# Altium PCB MiniPC.PcbDoc (part 14 of 24)
Units mm, origin at the board's own origin, x right, y up, seen from the top; angles counter-clockwise.
Board outline 175 x 155 mm, 16 copper layers (1_Top, 2_int1_(gnd), 3_int2_(power), 4_int3_(gnd), 5_int4_(sign), 6_int5_(power), 7_int6_(sign), 8_int7_(power), 9_int8_(gnd), 10_int9_(sign), 11_int10_(gnd), 12_int11_(sign), 13_int12_(gnd), 14_int13_(power), 15_int14_(gnd), 16_Bottom), stack 2.008 mm thick; 1046 components, 837 nets, 6010 pads, 4009 vias.
Unrouted connection lines stored in the file: 564.
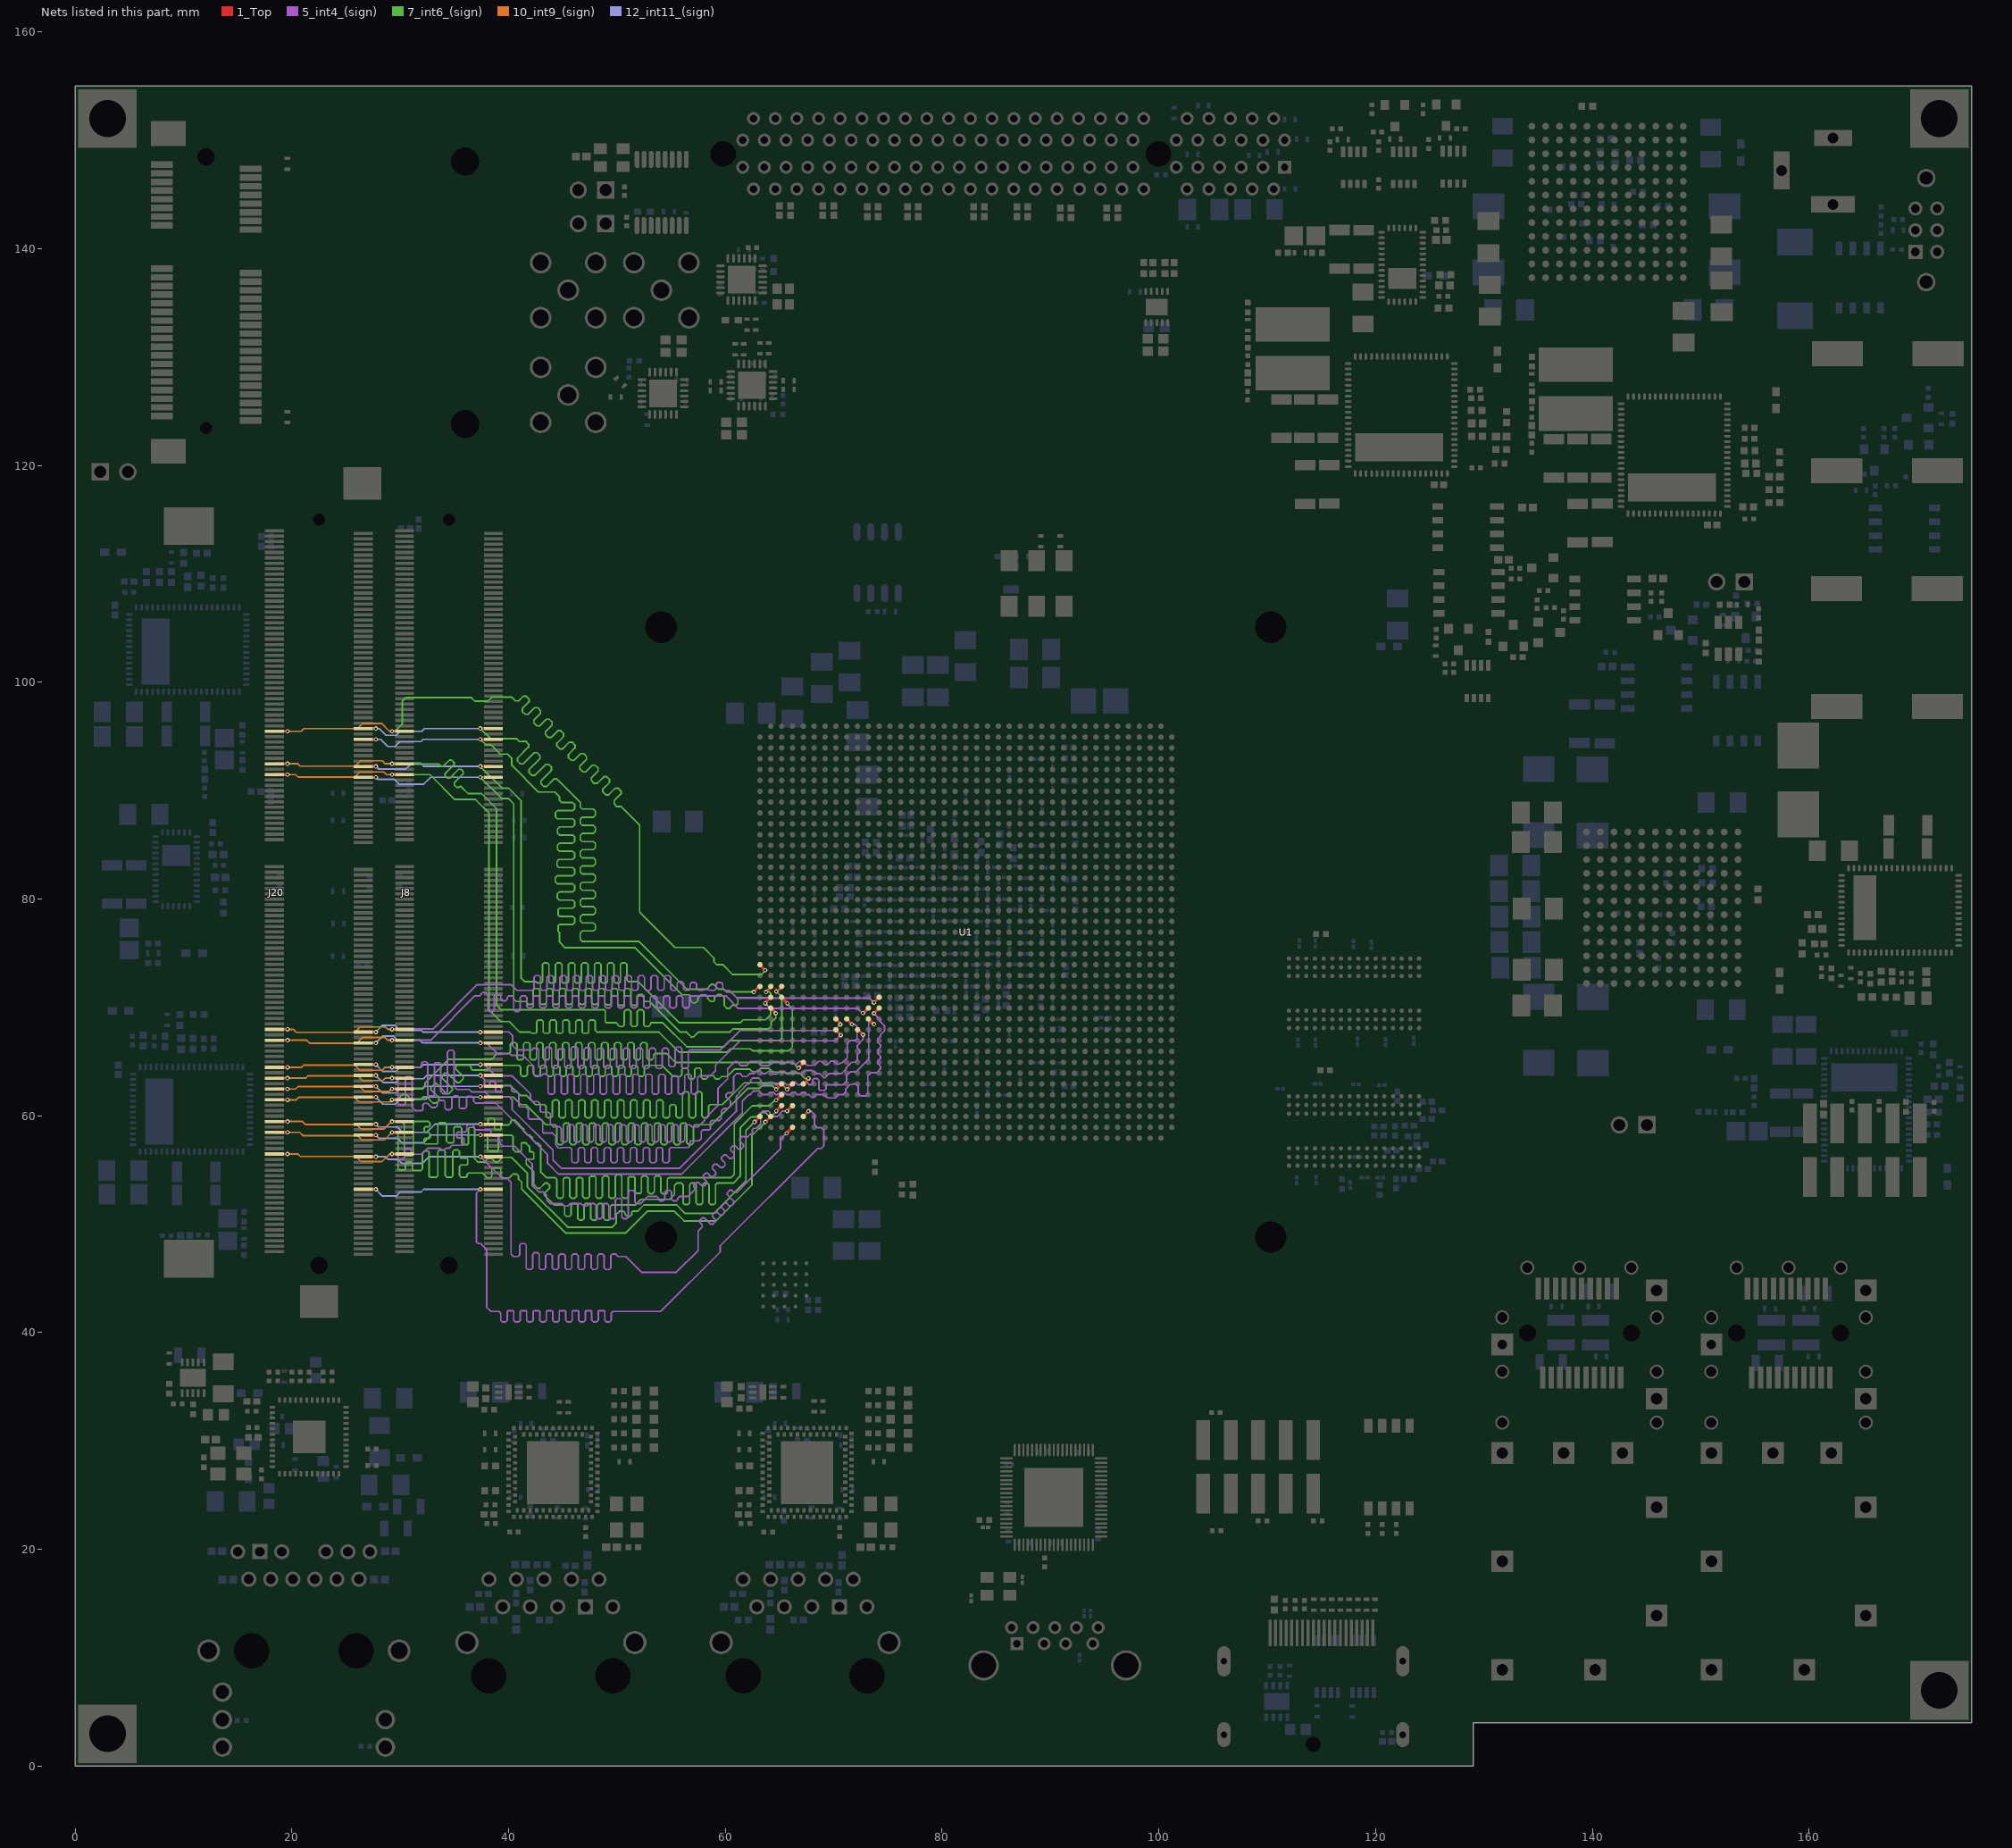
[diagram p26: the nets of this part, all layers, seen from the top]

## Via types
v1: diameter 0.4, hole 0.2, 1_Top to 16_Bottom, tented both sides, 1658 vias
v2: diameter 0.5, hole 0.2, 1_Top to 16_Bottom, tented both sides, 1014 vias
v3: diameter 0.7, hole 0.3, 1_Top to 16_Bottom, tented both sides, 915 vias
v4: diameter 0.6, hole 0.2, 1_Top to 16_Bottom, tented both sides, 278 vias
v5: diameter 0.4, hole 0.2, 1_Top to 16_Bottom, 93 vias
v6: diameter 0.4/0/0/0/0/0/0/0/0/0/0/0/0/0/0/0.4 (per signal layer), hole 0.2, 1_Top to 16_Bottom, tented both sides, 18 vias
v7: diameter 0.4/0/0/0/0/0/0/0/0/0/0/0.4/0.4/0.4/0.4/0.4 (per signal layer), hole 0.2, 1_Top to 16_Bottom, tented both sides, 16 vias
v8: diameter 0.5, hole 0.254, 1_Top to 16_Bottom, tented both sides, 15 vias
v9: diameter 0.5, hole 0.2, 1_Top to 16_Bottom, 2 vias

## Nets (pads, with @x,y where several pads share a name; then routed paths per layer and width w, separated by ;. In a path a pad name is that pad's centre, name@x,y a point inside that pad or via, vN(x,y) a via of type N, cw(c..) or ccw(c..) an arc to the next point about the centre after c; other vN are vias at no path point) (continued)
DDR4_SODIMM_DQ13: J8.25 J20.25 U1.AU5 | length 82.9
  1_Top w0.25: J20.25@26.6,53.225 v1(27.75,53.225) ; v1(37.398,53.225) J8.25@38.6,53.225 ; U1.AU5@67.194,59.939 67.194,59.944 v1(67.675,60.425)
  5_int4_(sign) w0.15: v1(37.398,53.225) 37.023,52.85 37.023,48.377 37.175,48.225 37.428,48.225 37.975,47.678 37.975,42.35 38.375,41.95 38.675,41.95 39.125,41.95 39.275,41.8 39.275,41.141 39.425,40.991 39.725,40.991 39.875,41.141 39.875,41.95 39.952,42.027 40.398,42.027 40.475,41.95 40.475,41.141 40.625,40.991 40.925,40.991 41.075,41.141 41.075,41.95 41.152,42.027 41.598,42.027 41.675,41.95 41.675,41.141 41.825,40.991 42.125,40.991 42.275,41.141 42.275,41.95 42.352,42.027 42.798,42.027 42.875,41.95 42.875,41.141 43.025,40.991 43.325,40.991 43.475,41.141 43.475,41.95 43.552,42.027 43.998,42.027 44.075,41.95 44.075,41.141 44.225,40.991 44.525,40.991 44.675,41.141 44.675,41.95 44.752,42.027 45.198,42.027 45.275,41.95 45.275,41.141 45.425,40.991 45.725,40.991 45.875,41.141 45.875,41.95 45.952,42.027 46.398,42.027 46.475,41.95 46.475,41.141 46.625,40.991 46.925,40.991 47.075,41.141 47.075,41.95 47.152,42.027 47.598,42.027 47.675,41.95 47.675,41.141 47.825,40.991 48.125,40.991 48.275,41.141 48.275,41.95 48.352,42.027 48.798,42.027 48.875,41.95 48.875,41.141 49.025,40.991 49.325,40.991 49.475,41.141 49.475,41.8 49.625,41.95 53.875,41.95 54.035,41.95 59.525,47.44 59.525,48 68.525,57 68.855,57 69.075,57.22 69.075,58.675 68.85,58.9 68.5,58.9 68.225,59.175 68.225,60.125 67.925,60.425 v1(67.675,60.425)
  12_int11_(sign) w0.15: v1(27.75,53.225) 28.375,52.6 29.625,52.6 30,52.975 31.925,52.975 32.175,53.225 v1(37.398,53.225)
DDR4_SODIMM_DQ14: J8.38 J20.38 U1.AT4 | length 83.3
  1_Top w0.25: J20.38@18.4,56.475 v1(19.602,56.475) ; v1(29.25,56.475) J8.38@30.4,56.475 ; v1(65.694,60.439) U1.AT4@66.194,60.939
  5_int4_(sign) w0.15: v1(29.25,56.475) 29.275,56.45 29.625,56.45 29.8,56.275 29.8,56.05 29.85,56 30.225,56 30.425,56.2 30.425,56.8 30.6,56.975 30.925,56.975 31.025,56.875 31.025,56.55 31.125,56.45 32,56.45 32.575,57.025 33.65,57.025 33.85,56.825 34.05,56.825 34.25,57.025 34.55,57.025 34.8,57.275 35.8,57.275 35.875,57.35 35.875,57.875 35.8,57.95 35.325,57.95 35.225,58.05 35.225,58.4 35.325,58.5 36.025,58.5 36.15,58.625 36.15,59.05 36.275,59.175 36.675,59.175 36.8,59.05 36.8,58.825 36.925,58.7 38.275,58.7 38.375,58.6 38.375,58.325 38.6,58.1 38.975,58.1 39.1,57.975 39.1,57.6 39.5,57.2 40.55,57.2 42.18,55.57 42.18,53.57 42.775,52.975 43.2,52.975 43.525,52.65 43.525,52.225 43.85,51.9 44.925,51.9 45.15,51.675 45.45,51.675 45.675,51.9 46.7,51.9 46.925,51.675 47.225,51.675 47.45,51.9 47.9,51.9 48.05,51.75 48.05,50.665 48.2,50.515 48.5,50.515 48.65,50.665 48.65,51.75 48.8,51.9 49.1,51.9 49.25,51.75 49.25,50.665 49.4,50.515 49.7,50.515 49.85,50.665 49.85,51.9 49.85,52.232 50,52.382 50.3,52.382 50.45,52.232 50.45,51.9 50.45,50.665 50.6,50.515 50.9,50.515 51.05,50.665 51.05,51.9 51.05,52.965 51.2,53.115 51.5,53.115 51.65,52.965 51.65,52.05 51.8,51.9 51.875,51.9 52.175,51.9 52.838,52.563 52.925,52.563 53.225,52.563 53.675,52.563 53.825,52.413 53.825,52.312 53.975,52.162 54.275,52.162 54.425,52.312 54.425,52.563 54.425,52.965 54.575,53.115 54.875,53.115 55.025,52.965 55.025,52.563 55.025,52.312 55.175,52.162 55.475,52.162 55.625,52.312 55.625,52.413 55.775,52.563 56.225,52.563 56.563,52.563 56.775,52.775 56.862,52.863 57.05,53.05 57.156,53.156 57.156,53.368 57.104,53.42 57.104,53.633 57.316,53.845 57.528,53.845 57.686,53.686 57.84,53.533 58.052,53.533 58.264,53.745 58.264,53.957 58.111,54.111 57.952,54.269 57.952,54.481 58.164,54.693 58.377,54.693 58.535,54.535 58.688,54.382 58.9,54.382 59.112,54.594 59.112,54.806 58.959,54.959 58.801,55.118 58.801,55.33 59.013,55.542 59.225,55.542 59.383,55.383 59.537,55.23 59.749,55.23 59.961,55.442 59.961,55.655 59.808,55.808 59.649,55.966 59.649,56.178 59.861,56.39 60.074,56.39 60.232,56.232 60.385,56.079 60.597,56.079 60.809,56.291 60.809,56.503 60.656,56.656 60.498,56.815 60.498,57.027 60.71,57.239 60.922,57.239 61.081,57.081 61.234,56.927 61.446,56.927 61.658,57.139 61.658,57.352 61.505,57.505 61.346,57.663 61.346,57.875 61.559,58.087 61.771,58.087 61.823,58.035 62.035,58.035 62.125,58.125 62.288,58.288 62.425,58.288 62.5,58.362 62.5,58.75 62.6,58.85 62.85,58.85 63.25,59.25 63.25,60.225 63.45,60.425 63.975,60.425 64.125,60.275 64.125,60.05 64.225,59.95 64.8,59.95 65.289,60.439 v1(65.694,60.439)
  10_int9_(sign) w0.15: v1(19.602,56.475) 20.575,56.475 20.8,56.25 25.925,56.25 26.4,55.775 28.325,55.775 29.025,56.475 v1(29.25,56.475)
DDR4_SODIMM_DQ15: J8.37 J20.37 U1.AV4 | length 81.2
  1_Top w0.25: J20.37@26.6,56.225 v1(27.75,56.225) ; v1(37.398,56.225) J8.37@38.6,56.225 ; v1(65.65,58.395) U1.AV4@66.194,58.939
  5_int4_(sign) w0.15: v1(37.398,56.225) 37.425,56.225 39.425,54.225 39.875,54.225 40.225,53.875 40.225,47.225 40.425,47.025 40.725,47.025 40.875,47.025 41.025,47.175 41.025,48.075 41.175,48.225 41.475,48.225 41.625,48.075 41.625,47.025 41.625,45.975 41.775,45.825 42.075,45.825 42.225,45.975 42.225,47.025 42.225,47.23 42.375,47.38 42.675,47.38 42.825,47.23 42.825,47.025 42.825,45.975 42.975,45.825 43.275,45.825 43.425,45.975 43.425,47.025 43.425,47.09 43.575,47.24 43.875,47.24 44.025,47.09 44.025,47.025 44.025,45.975 44.175,45.825 44.475,45.825 44.625,45.975 44.625,47.025 44.625,47.09 44.775,47.24 45.075,47.24 45.225,47.09 45.225,47.025 45.225,45.975 45.375,45.825 45.675,45.825 45.825,45.975 45.825,47.025 45.825,47.09 45.975,47.24 46.275,47.24 46.425,47.09 46.425,47.025 46.425,45.975 46.575,45.825 46.875,45.825 47.025,45.975 47.025,47.025 47.025,47.09 47.175,47.24 47.475,47.24 47.625,47.09 47.625,47.025 47.625,45.975 47.775,45.825 48.075,45.825 48.225,45.975 48.225,47.025 48.225,47.09 48.375,47.24 48.675,47.24 48.825,47.09 48.825,47.025 48.825,45.975 48.975,45.825 49.275,45.825 49.425,45.975 49.425,47.025 49.425,47.09 49.575,47.24 49.875,47.24 50.025,47.09 50.09,47.025 50.625,47.025 50.804,47.025 51.016,46.813 51.127,46.702 52.264,45.565 55.486,45.565 57.485,47.564 57.485,49.36 57.75,49.625 57.856,49.731 57.856,49.943 57.641,50.158 57.641,50.37 57.853,50.582 58.066,50.582 58.386,50.261 58.645,50.003 58.857,50.003 59.069,50.215 59.069,50.427 58.811,50.686 58.811,50.832 59.088,51.11 59.235,51.11 59.493,50.852 59.705,50.852 59.918,51.064 59.918,51.276 59.659,51.534 59.659,51.681 59.937,51.958 60.083,51.958 60.342,51.7 60.554,51.7 60.766,51.912 60.766,52.124 60.508,52.383 60.187,52.704 60.187,52.916 60.399,53.128 60.611,53.128 60.826,52.913 61.038,52.913 62.037,53.912 65.1,56.975 65.1,57.845 v1(65.65,58.395) v1@65.738,58.395
  12_int11_(sign) w0.15: v1(27.75,56.225) 28.65,56.225 28.9,55.975 29.8,55.975 30.175,55.6 32.025,55.6 32.65,56.225 v1(37.398,56.225)
DDR4_SODIMM_DQ16: J8.50 J20.50 U1.AU1 | length 79.5
  1_Top w0.25: J20.50@18.4,59.475 v1(19.602,59.475) ; v1(29.25,59.475) J8.50@30.4,59.475 ; v1(62.694,59.439) U1.AU1@63.194,59.939
  7_int6_(sign) w0.15: v1(29.25,59.475) 30.125,59.475 30.375,59.225 30.375,56.5 30.575,56.3 31.1,56.3 31.2,56.4 31.2,59.325 31.35,59.475 32.6,59.475 32.75,59.325 32.75,59.075 32.675,59 32.35,59 32.225,58.875 32.225,58.6 32.35,58.475 32.625,58.475 32.75,58.35 32.75,58 32.675,57.925 32.325,57.925 32.2,57.8 32.2,57.5 32.3,57.4 33.375,57.4 33.475,57.5 33.475,59.225 33.6,59.35 34.15,59.35 34.275,59.225 34.275,57.675 34.45,57.5 34.825,57.5 34.95,57.625 34.95,58.875 35.075,59 35.525,59 35.675,58.85 35.675,57.45 35.775,57.35 36.2,57.35 36.3,57.45 36.3,58.825 36.4,58.925 36.75,58.925 36.875,58.8 36.875,56.025 37.175,55.725 37.75,55.725 38.1,56.075 38.45,56.075 38.8,55.725 39,55.725 39.45,56.175 40.275,56.175 41.725,54.725 41.725,53.45 45.45,49.725 49.575,49.725 49.925,50.075 49.925,50.9 50.225,51.2 50.6,51.2 50.725,51.075 50.725,50.95 50.95,50.725 51.2,50.725 51.375,50.9 51.375,51.15 51.425,51.2 51.9,51.2 52.48,51.78 55.52,51.78 56.31,50.99 58.915,50.99 61.902,53.977 61.902,58.648 v1(62.694,59.439)
  10_int9_(sign) w0.15: v1(19.602,59.475) 20.975,59.475 21.25,59.2 25.95,59.2 26.375,58.775 28.475,58.775 29.175,59.475 v1(29.25,59.475)
DDR4_SODIMM_DQ17: J8.49 J20.49 U1.AR3 | length 82.7
  1_Top w0.25: J20.49@26.6,59.225 v1(27.75,59.225) ; v1(37.398,59.225) J8.49@38.6,59.225 ; v1(64.694,61.439) U1.AR3@65.194,61.939
  7_int6_(sign) w0.15: v1(37.398,59.225) 37.473,59.15 37.9,59.15 38.1,59.35 38.1,59.729 38.171,59.8 38.6,59.8 38.7,59.7 38.7,58.8 38.775,58.725 39.2,58.725 39.3,58.825 39.3,59.05 39.4,59.15 40,59.15 40.2,59.35 40.2,59.5 40.3,59.6 40.6,59.6 41.025,59.175 41.025,59.15 41.4,58.775 41.4,58.575 41.775,58.2 41.975,58.2 42.2,57.975 42.2,57.8 42.525,57.475 42.7,57.475 42.975,57.2 42.975,54.8 43.475,54.3 44.3,54.3 44.45,54.15 44.45,52.555 44.6,52.405 44.9,52.405 45.05,52.555 45.05,54.15 45.2,54.3 45.5,54.3 45.65,54.15 45.65,52.555 45.8,52.405 46.1,52.405 46.25,52.555 46.25,54.15 46.4,54.3 46.7,54.3 46.85,54.15 46.85,52.555 47,52.405 47.3,52.405 47.45,52.555 47.45,54.3 47.56,54.41 47.94,54.41 48.05,54.3 48.05,52.555 48.2,52.405 48.5,52.405 48.65,52.555 48.65,54.305 48.8,54.455 49.1,54.455 49.25,54.305 49.25,52.555 49.4,52.405 49.7,52.405 49.85,52.555 49.85,54.424 50,54.574 50.3,54.574 50.45,54.424 50.45,52.555 50.6,52.405 50.9,52.405 51.05,52.555 51.05,54.3 51.135,54.385 51.565,54.385 51.65,54.3 51.65,53 51.8,52.85 52.15,52.85 52.25,52.95 52.25,54.305 52.4,54.455 52.7,54.455 52.85,54.305 52.85,53 53.05,52.8 53.25,52.8 53.45,53 53.45,54.311 53.6,54.461 53.9,54.461 54.05,54.311 54.05,52.95 54.2,52.8 54.55,52.8 54.65,52.9 54.65,54.15 54.8,54.3 60.525,54.3 60.825,54.6 60.825,59.275 62.475,60.925 64.05,60.925 64.564,61.439 v1(64.694,61.439)
  12_int11_(sign) w0.15: v1(27.75,59.225) 28,58.975 29.725,58.975 30.225,58.475 32.45,58.475 33.2,59.225 v1(37.398,59.225)
DDR4_SODIMM_DQ18: J8.62 J20.62 U1.AM5 | length 83.6
  1_Top w0.25: J20.62@18.4,62.475 v1(19.602,62.475) ; v1(29.25,62.475) J8.62@30.4,62.475 ; v1(66.775,64.425) 66.775,64.45 67.194,64.869 U1.AM5@67.194,64.939
  7_int6_(sign) w0.15: v1(29.25,62.475) 29.275,62.5 32.1,62.5 32.3,62.7 32.3,63.05 34.45,65.2 38.4,65.2 38.95,65.75 40.025,65.75 40.175,65.9 40.175,66.6 40.325,66.75 40.625,66.75 40.775,66.6 40.775,65.31 40.925,65.16 41.225,65.16 41.375,65.31 41.375,66.6 41.525,66.75 41.825,66.75 41.975,66.6 41.975,65.31 42.125,65.16 42.425,65.16 42.575,65.31 42.575,66.6 42.725,66.75 43.025,66.75 43.175,66.6 43.175,65.31 43.325,65.16 43.625,65.16 43.775,65.31 43.775,66.6 43.925,66.75 44.225,66.75 44.375,66.6 44.375,65.31 44.525,65.16 44.825,65.16 44.975,65.31 44.975,66.6 45.125,66.75 45.425,66.75 45.575,66.6 45.575,65.31 45.725,65.16 46.025,65.16 46.175,65.31 46.175,66.6 46.325,66.75 46.625,66.75 46.775,66.6 46.775,65.31 46.925,65.16 47.225,65.16 47.375,65.31 47.375,66.6 47.525,66.75 47.825,66.75 47.975,66.6 47.975,65.31 48.125,65.16 48.425,65.16 48.575,65.31 48.575,66.6 48.725,66.75 49.025,66.75 49.175,66.6 49.175,65.31 49.325,65.16 49.625,65.16 49.775,65.31 49.775,66.6 49.925,66.75 50.225,66.75 50.375,66.6 50.375,65.31 50.525,65.16 50.825,65.16 50.975,65.31 50.975,66.6 51.125,66.75 51.425,66.75 51.575,66.6 51.575,65.31 51.725,65.16 52.025,65.16 52.175,65.31 52.175,66.6 52.325,66.75 52.625,66.75 52.775,66.6 52.775,65.31 52.925,65.16 53.225,65.16 53.375,65.31 53.375,65.6 53.525,65.75 54.576,65.75 55.401,64.925 66.208,64.925 66.708,64.425 v1(66.775,64.425)
  10_int9_(sign) w0.15: v1(19.602,62.475) 20.35,62.475 20.575,62.7 26.25,62.7 26.7,62.25 29.025,62.25 v1(29.25,62.475)
DDR4_SODIMM_DQ19: J8.63 J20.63 U1.AP4 | length 82.5
  1_Top w0.25: J20.63@26.6,62.725 v1(27.75,62.725) ; v1(37.398,62.725) J8.63@38.6,62.725 ; v1(65.694,62.439) U1.AP4@66.194,62.939
  7_int6_(sign) w0.15: v1(37.398,62.725) 37.448,62.775 40.2,62.775 41.088,61.887 41.638,61.887 42.501,61.025 43.3,61.025 43.45,60.875 43.45,59.975 43.6,59.825 43.9,59.825 44.05,59.975 44.05,61.302 44.2,61.452 44.5,61.452 44.65,61.302 44.65,59.975 44.8,59.825 45.1,59.825 45.25,59.975 45.25,61.302 45.4,61.452 45.7,61.452 45.85,61.302 45.85,59.975 46,59.825 46.3,59.825 46.45,59.975 46.45,61.302 46.6,61.452 46.9,61.452 47.05,61.302 47.05,59.975 47.2,59.825 47.5,59.825 47.65,59.975 47.65,61.302 47.8,61.452 48.1,61.452 48.25,61.302 48.25,59.975 48.4,59.825 48.7,59.825 48.85,59.975 48.85,61.302 49,61.452 49.3,61.452 49.45,61.302 49.45,59.975 49.6,59.825 49.9,59.825 50.05,59.975 50.05,61.302 50.2,61.452 50.5,61.452 50.65,61.302 50.65,59.975 50.8,59.825 51.1,59.825 51.25,59.975 51.25,61.302 51.4,61.452 51.7,61.452 51.85,61.302 51.85,59.975 52,59.825 52.3,59.825 52.45,59.975 52.45,61.302 52.6,61.452 52.9,61.452 53.05,61.302 53.05,59.975 53.2,59.825 53.5,59.825 53.65,59.975 53.65,61.302 53.8,61.452 54.1,61.452 54.25,61.302 54.25,59.975 54.4,59.825 54.7,59.825 54.85,59.975 54.85,60.875 55,61.025 55.3,61.025 55.45,60.875 55.45,59.975 55.6,59.825 55.9,59.825 56.05,59.975 56.05,62.075 56.2,62.225 56.5,62.225 56.65,62.075 56.65,59.975 56.8,59.825 57.1,59.825 57.25,59.975 57.25,62.075 57.4,62.225 57.7,62.225 57.85,62.075 57.85,59.975 58,59.825 58.3,59.825 58.45,59.975 58.45,60.875 58.6,61.025 59.725,61.025 61.753,63.053 63.517,63.053 63.545,63.025 64.476,63.025 64.501,63 65.133,63 v1(65.694,62.439)
  12_int11_(sign) w0.15: v1(27.75,62.725) 28.375,62.1 29.575,62.1 30,62.525 32.05,62.525 32.25,62.725 v1(37.398,62.725)
DDR4_SODIMM_DQ20: J8.46 J20.46 U1.AU2 | length 79.5
  1_Top w0.25: J20.46@18.4,58.475 v1(19.602,58.475) ; v1(29.25,58.475) J8.46@30.4,58.475 ; v1(63.694,59.439) U1.AU2@64.194,59.939
  7_int6_(sign) w0.15: v1(29.25,58.475) 29.7,58.475 29.8,58.375 29.8,55.125 29.925,55 30.425,55 30.475,55.05 30.475,55.65 30.575,55.75 31.025,55.75 31.125,55.65 31.125,55.05 31.225,54.95 31.9,54.95 32.05,55.1 32.05,56.575 32.225,56.75 32.55,56.75 32.675,56.625 32.675,54.425 32.775,54.325 33.325,54.325 33.475,54.475 33.475,56.7 33.625,56.85 34,56.85 34.15,56.7 34.15,54.475 34.3,54.325 34.725,54.325 34.85,54.45 34.85,56.7 35,56.85 35.325,56.85 35.475,56.7 35.475,56.25 35.625,56.1 36.125,56.1 36.225,56 36.225,55.55 36.15,55.475 35.625,55.475 35.475,55.325 35.475,54.475 35.625,54.325 36.075,54.325 36.175,54.425 36.175,54.6 36.3,54.725 37.6,54.725 38.05,54.275 38.3,54.275 38.45,54.425 38.45,55.075 38.55,55.175 39.2,55.175 39.275,55.1 39.275,54.5 39.5,54.275 40.05,54.275 40.4,54.625 40.75,54.625 40.9,54.475 40.9,54.2 41.215,53.885 41.215,53.239 45.279,49.175 50.775,49.175 52.8,51.2 55.3,51.2 56.2,50.3 59.125,50.3 62.45,53.625 62.45,58.195 v1(63.694,59.439)
  10_int9_(sign) w0.15: v1(19.602,58.475) 20.72,58.475 21.02,58.175 26.05,58.175 26.45,57.775 28.55,57.775 v1(29.25,58.475)
DDR4_SODIMM_DQ21: J8.45 J20.45 U1.AT3 | length 79.8
  1_Top w0.25: J20.45@26.6,58.225 v1(27.75,58.225) ; v1(37.398,58.225) J8.45@38.6,58.225 ; v1(64.694,60.439) U1.AT3@65.194,60.939
  7_int6_(sign) w0.15: v1(37.398,58.225) 37.9,58.225 38.075,58.05 38.075,56.875 38.225,56.725 38.975,56.725 39.05,56.8 39.05,57.95 39.3,58.2 40.3,58.2 40.425,58.075 40.425,56.9 40.65,56.675 41.05,56.675 41.175,56.8 41.175,57.45 41.225,57.5 41.6,57.5 41.925,57.175 41.925,56.75 42,56.675 42.225,56.675 42.325,56.575 42.325,56 41.7,56 41.625,55.925 41.625,55.55 42.325,54.85 42.325,53.65 42.353,53.622 42.671,53.304 42.883,53.304 43.369,53.79 43.581,53.79 43.793,53.578 43.793,53.366 43.307,52.88 43.307,52.668 43.625,52.35 43.837,52.138 44.2,51.775 44.275,51.775 44.575,51.775 45.025,51.775 45.175,51.625 45.175,50.877 45.325,50.727 45.625,50.727 45.775,50.877 45.775,51.775 45.895,51.895 46.255,51.895 46.375,51.775 46.375,50.54 46.525,50.39 46.825,50.39 46.975,50.54 46.975,51.775 47.095,51.895 47.455,51.895 47.575,51.775 47.575,50.54 47.725,50.39 48.025,50.39 48.175,50.54 48.175,51.775 48.295,51.895 48.655,51.895 48.775,51.775 48.775,50.54 48.925,50.39 49.225,50.39 49.375,50.54 49.375,51.625 49.525,51.775 49.775,51.775 51.7,51.775 52.215,52.29 54.861,52.29 55.3,52.729 55.3,53.575 55.515,53.79 55.95,53.79 56.1,53.64 56.1,51.965 56.25,51.815 56.55,51.815 56.7,51.965 56.7,53.64 56.85,53.79 57.15,53.79 57.3,53.64 57.3,51.965 57.45,51.815 57.75,51.815 57.9,51.965 57.9,53.64 58.05,53.79 58.35,53.79 58.5,53.64 58.5,51.965 58.65,51.815 58.95,51.815 59.1,51.965 59.1,53.64 59.25,53.79 59.7,53.79 60.3,53.79 60.6,53.79 60.736,53.79 61.375,54.429 61.375,58.9 62.375,59.9 62.9,59.9 63.3,60.3 63.7,60.3 64.05,59.95 64.25,59.95 64.694,60.394 v1(64.694,60.439)
  12_int11_(sign) w0.15: v1(27.75,58.225) 28.05,57.925 29.75,57.925 30.175,57.5 32.125,57.5 32.85,58.225 v1(37.398,58.225)
DDR4_SODIMM_DQ22: J8.58 J20.58 U1.AP5 | length 82.5
  1_Top w0.25: J20.58@18.4,61.475 v1(19.602,61.475) ; v1(29.25,61.475) J8.58@30.4,61.475 ; U1.AP5@67.194,62.939 67.675,63.42 v1(67.675,63.45)
  7_int6_(sign) w0.15: v1(29.25,61.475) 29.275,61.5 29.725,61.5 30.2,61.975 30.55,61.975 31.025,61.5 31.9,61.5 32.162,61.762 32.438,61.762 33.025,61.175 33.3,61.175 33.575,61.45 33.575,61.675 32.825,62.425 32.825,62.575 33.225,62.975 33.35,62.975 34.3,62.025 34.475,62.025 34.825,62.375 34.825,62.525 33.85,63.5 33.85,63.675 34.125,63.95 34.35,63.95 35.225,63.075 35.475,63.075 35.825,63.425 35.825,63.625 35.125,64.325 35.125,64.525 35.25,64.65 36.4,64.65 36.55,64.5 36.55,64.325 36.65,64.225 38.05,64.225 38.475,64.65 40.975,64.65 41.125,64.5 41.125,63.8 41.275,63.65 41.575,63.65 41.725,63.8 41.725,64.5 41.875,64.65 42.175,64.65 42.325,64.5 42.325,63.8 42.475,63.65 42.775,63.65 42.925,63.8 42.925,64.5 43.075,64.65 43.375,64.65 43.525,64.5 43.525,63.8 43.675,63.65 43.975,63.65 44.125,63.8 44.125,64.5 44.275,64.65 44.575,64.65 44.725,64.5 44.725,63.8 44.875,63.65 45.175,63.65 45.325,63.8 45.325,64.5 45.475,64.65 45.775,64.65 45.925,64.5 45.925,63.8 46.075,63.65 46.375,63.65 46.525,63.8 46.525,64.5 46.675,64.65 46.975,64.65 47.125,64.5 47.125,63.8 47.275,63.65 47.575,63.65 47.725,63.8 47.725,64.5 47.875,64.65 48.175,64.65 48.325,64.5 48.325,63.8 48.475,63.65 48.775,63.65 48.925,63.8 48.925,64.5 49.075,64.65 49.375,64.65 49.525,64.5 49.525,63.8 49.675,63.65 49.975,63.65 50.125,63.8 50.125,64.5 50.275,64.65 50.575,64.65 50.725,64.5 50.725,63.8 50.875,63.65 51.175,63.65 51.325,63.8 51.325,64.5 51.475,64.65 51.775,64.65 51.925,64.5 51.925,63.8 52.075,63.65 52.375,63.65 52.525,63.8 52.525,64.5 52.675,64.65 54.15,64.65 55.175,63.625 55.825,63.625 55.975,63.775 55.975,64.265 56.125,64.415 56.425,64.415 56.575,64.265 56.575,63.547 56.725,63.397 57.025,63.397 57.175,63.547 57.175,64.265 57.325,64.415 57.625,64.415 57.775,64.265 57.775,63.547 57.925,63.397 58.225,63.397 58.375,63.547 58.375,63.625 58.463,63.713 58.887,63.713 58.975,63.625 58.975,63.547 59.125,63.397 59.425,63.397 59.653,63.625 60.179,63.625 60.867,64.313 62.25,64.313 62.25,64.295 62.47,64.075 62.95,64.075 63.25,64.375 64.025,64.375 64.325,64.075 64.445,64.075 64.495,64.025 65.475,64.025 65.575,63.925 66.875,63.925 67.35,63.45 v1(67.675,63.45)
  10_int9_(sign) w0.15: v1(19.602,61.475) 20.4,61.475 20.625,61.7 25.8,61.7 26.225,61.275 29.05,61.275 v1(29.25,61.475)
DDR4_SODIMM_DQ23: J8.59 J20.59 U1.AP3 | length 82.5
  1_Top w0.25: J20.59@26.6,61.725 v1(27.75,61.725) ; v1(37.398,61.725) J8.59@38.6,61.725 ; v1(64.694,62.439) U1.AP3@65.194,62.939
  7_int6_(sign) w0.15: v1(37.398,61.725) 40.45,61.725 41.15,61.025 41.6,61.025 43.45,59.175 44.3,59.175 44.45,59.025 44.45,57.5 44.6,57.35 44.9,57.35 45.05,57.5 45.05,59.175 45.2,59.325 45.5,59.325 45.65,59.175 45.65,57.5 45.8,57.35 46.1,57.35 46.25,57.5 46.25,59.175 46.4,59.325 46.7,59.325 46.85,59.175 46.85,57.5 47,57.35 47.3,57.35 47.45,57.5 47.45,59.175 47.6,59.325 47.9,59.325 48.05,59.175 48.05,57.5 48.2,57.35 48.5,57.35 48.65,57.5 48.65,59.175 48.8,59.325 49.1,59.325 49.25,59.175 49.25,57.5 49.4,57.35 49.7,57.35 49.85,57.5 49.85,59.175 50,59.325 50.3,59.325 50.45,59.175 50.45,57.5 50.6,57.35 50.9,57.35 51.05,57.5 51.05,59.175 51.2,59.325 51.5,59.325 51.65,59.175 51.65,57.5 51.8,57.35 52.1,57.35 52.25,57.5 52.25,59.175 52.4,59.325 52.7,59.325 52.85,59.175 52.85,57.5 53,57.35 53.3,57.35 53.45,57.5 53.45,59.175 53.6,59.325 53.9,59.325 54.05,59.175 54.05,57.5 54.2,57.35 54.5,57.35 54.65,57.5 54.65,59.175 54.8,59.325 55.1,59.325 55.25,59.175 55.25,57.5 55.4,57.35 55.7,57.35 55.85,57.5 55.85,59.175 56,59.325 56.3,59.325 56.45,59.175 56.45,57.5 56.6,57.35 56.9,57.35 57.05,57.5 57.05,59.025 57.2,59.175 58.725,59.175 62.075,62.525 63.125,62.525 63.375,62.775 64.358,62.775 v1(64.694,62.439)
  12_int11_(sign) w0.15: v1(27.75,61.725) 28.4,61.075 29.525,61.075 30,61.55 32.4,61.55 32.575,61.725 v1(37.398,61.725)
DDR4_SODIMM_DQ24: J8.70 J20.70 U1.AH11 | length 89.8
  1_Top w0.25: J20.70@18.4,64.475 v1(19.602,64.475) ; v1(29.25,64.475) J8.70@30.4,64.475 ; U1.AH11@73.194,68.939 73.68,68.453 v1(73.704,68.453)
  5_int4_(sign) w0.15: v1(29.25,64.475) 31.8,64.475 31.95,64.625 31.95,64.835 32.1,64.985 32.4,64.985 32.55,64.835 32.55,61.9 32.625,61.825 33.075,61.825 33.15,61.9 33.15,64.775 33.275,64.9 33.65,64.9 33.75,64.8 33.75,62.225 33.925,62.05 34.2,62.05 34.35,62.2 34.35,65.85 34.55,66.05 34.825,66.05 34.975,65.9 34.975,62.7 35.25,62.425 36.375,62.425 36.6,62.2 37.825,62.2 38.275,61.75 40.075,61.75 40.325,61.5 40.325,60.6 44.1,56.825 44.1,55.925 44.875,55.15 55.754,55.15 61,60.396 61,61.775 61.3,62.075 61.3,62.2 62.038,62.938 62.163,62.938 62.325,63.1 62.325,63.275 62.525,63.475 63.075,63.475 63.275,63.275 63.275,63.175 63.55,62.9 63.85,62.9 64.025,63.075 64.375,63.075 64.575,62.875 64.825,62.875 65.075,63.125 65.4,63.125 65.625,62.9 65.625,62.875 65.925,62.875 66.175,63.125 66.42,63.125 66.495,63.05 66.5,63.05 66.675,62.875 66.9,62.875 67.15,63.125 67.47,63.125 67.52,63.075 67.525,63.075 67.725,62.875 67.925,62.875 68.05,63 68.05,63.3 68.2,63.45 68.45,63.45 68.625,63.275 68.625,62.475 68.75,62.35 69.15,62.35 69.3,62.5 69.3,62.825 69.35,62.875 70.875,62.875 71.175,63.175 71.175,63.7 71.529,64.054 72.029,64.054 73.225,65.25 73.225,68.575 73.275,68.625 73.532,68.625 v1(73.704,68.453)
  10_int9_(sign) w0.15: v1(19.602,64.475) 20.9,64.475 21.1,64.675 25.8,64.675 26.275,64.2 28.325,64.2 28.6,64.475 v1(29.25,64.475)
DDR4_SODIMM_DQ25: J8.71 J20.71 U1.AH9 | length 88.6
  1_Top w0.25: J20.71@26.6,64.725 v1(27.75,64.725) ; v1(37.398,64.725) J8.71@38.6,64.725 ; U1.AH9@71.194,68.939 v1(71.683,68.45)
  5_int4_(sign) w0.15: v1(37.398,64.725) 37.75,64.725 38.775,63.7 40.325,63.7 42.025,62 42.025,61.525 42.238,61.312 42.713,61.312 42.912,61.113 42.912,60.438 43.025,60.325 43.7,60.325 43.85,60.175 43.85,59.25 44.1,59 44.7,59 44.85,58.85 44.85,57.75 45,57.6 45.3,57.6 45.45,57.75 45.45,59.024 45.6,59.174 45.9,59.174 46.05,59.024 46.05,57.75 46.2,57.6 46.5,57.6 46.65,57.75 46.65,59.024 46.8,59.174 47.1,59.174 47.25,59.024 47.25,57.75 47.4,57.6 47.7,57.6 47.85,57.75 47.85,59.024 48,59.174 48.3,59.174 48.45,59.024 48.45,57.75 48.6,57.6 48.9,57.6 49.05,57.75 49.05,59.024 49.2,59.174 49.5,59.174 49.65,59.024 49.65,57.75 49.8,57.6 50.1,57.6 50.25,57.75 50.25,59.024 50.4,59.174 50.7,59.174 50.85,59.024 50.85,57.75 51,57.6 51.3,57.6 51.45,57.75 51.45,59.024 51.6,59.174 51.9,59.174 52.05,59.024 52.05,57.75 52.2,57.6 52.5,57.6 52.65,57.75 52.65,59.024 52.8,59.174 53.1,59.174 53.25,59.024 53.25,57.75 53.4,57.6 53.7,57.6 53.85,57.75 53.85,59.024 54,59.174 54.3,59.174 54.45,59.024 54.45,57.75 54.6,57.6 54.9,57.6 55.05,57.75 55.05,59.024 55.2,59.174 55.5,59.174 55.65,59.024 55.65,57.75 55.8,57.6 56.1,57.6 56.25,57.75 56.25,59.024 56.4,59.174 56.7,59.174 56.874,59 57.51,59 58.11,59.6 58.11,59.735 59.31,60.935 59.31,62.51 60.2,63.4 60.2,64.333 60.892,65.025 61.05,65.025 61.45,64.625 61.925,64.625 62.325,65.025 62.925,65.025 63.325,64.625 64,64.625 64.4,65.025 64.875,65.025 65.125,64.775 65.425,64.775 65.675,65.025 65.875,65.025 66.125,64.775 66.575,64.775 66.825,65.025 67.15,65.025 67.525,64.65 68.225,64.65 68.6,65.025 68.875,65.025 69.175,64.725 69.425,64.725 69.75,65.05 70.025,65.05 70.295,64.78 70.5,64.78 70.62,64.9 70.8,64.9 71.25,65.35 71.25,66.65 71.55,66.95 72,66.95 72.15,67.1 72.15,68.25 71.95,68.45 v1(71.683,68.45)
  12_int11_(sign) w0.15: v1(27.75,64.725) 28.375,64.1 29.625,64.1 29.975,64.45 31.875,64.45 32.15,64.725 v1(37.398,64.725)
DDR4_SODIMM_DQ26: J8.83 J20.83 U1.AH8 | length 89.4
  1_Top w0.25: J20.83@26.6,67.725 v1(27.75,67.725) ; v1(37.398,67.725) J8.83@38.6,67.725 ; U1.AH8@70.194,68.939 70.608,68.525 v1(70.608,68.425)
  5_int4_(sign) w0.15: v1(37.398,67.725) 37.423,67.75 40.025,67.75 40.362,67.412 40.362,66.487 40.765,66.085 42.16,66.085 42.325,66.25 42.625,66.25 42.775,66.1 42.775,64.523 42.925,64.373 43.225,64.373 43.375,64.523 43.375,66.181 43.525,66.331 43.825,66.331 43.975,66.181 43.975,64.523 44.125,64.373 44.425,64.373 44.575,64.523 44.575,66.085 44.65,66.16 45.1,66.16 45.175,66.085 45.175,64.523 45.325,64.373 45.625,64.373 45.775,64.523 45.775,66.22 45.925,66.37 46.225,66.37 46.375,66.22 46.375,64.523 46.525,64.373 46.825,64.373 46.975,64.523 46.975,66.137 47.125,66.287 47.425,66.287 47.575,66.137 47.575,64.523 47.725,64.373 48.025,64.373 48.175,64.523 48.175,66.085 48.313,66.223 48.637,66.223 48.775,66.085 48.775,64.523 48.925,64.373 49.225,64.373 49.375,64.523 49.375,66.085 49.5,66.21 49.85,66.21 49.975,66.085 49.975,64.523 50.125,64.373 50.425,64.373 50.575,64.523 50.575,66.085 50.725,66.235 51.025,66.235 51.175,66.085 51.175,64.523 51.325,64.373 51.625,64.373 51.775,64.523 51.775,66.085 51.925,66.235 52.225,66.235 52.375,66.085 52.375,64.523 52.525,64.373 52.825,64.373 52.975,64.523 52.975,66.085 53.125,66.235 53.425,66.235 53.575,66.085 53.575,64.523 53.725,64.373 54.025,64.373 54.175,64.523 54.175,66.085 54.325,66.235 54.625,66.235 54.775,66.085 54.775,64.685 54.925,64.535 55.225,64.535 55.375,64.685 55.375,66.198 55.525,66.348 55.825,66.348 55.975,66.198 55.975,64.523 56.125,64.373 56.425,64.373 56.575,64.523 56.575,65.935 56.725,66.085 59.56,66.085 61.35,67.875 70.042,67.875 70.592,68.425 v1(70.608,68.425)
  12_int11_(sign) w0.15: v1(27.75,67.725) 28.375,68.35 29.5,68.35 29.95,67.9 31.925,67.9 32.1,67.725 v1(37.398,67.725)
DDR4_SODIMM_DQ27: J8.84 J20.84 U1.AF12 | length 90.2
  1_Top w0.25: J20.84@18.4,67.975 v1(19.602,67.975) ; v1(29.25,67.975) J8.84@30.4,67.975 ; v1@73.694,70.439 U1.AF12@74.194,70.939 v1(73.705,70.45)
  5_int4_(sign) w0.15: v1(29.25,67.975) 29.275,68 33,68 37.1,72.1 40.225,72.1 40.75,71.575 42.2,71.575 42.35,71.725 42.35,72.781 42.5,72.931 42.8,72.931 42.95,72.781 42.95,71.725 43.1,71.575 43.4,71.575 43.55,71.725 43.55,72.781 43.7,72.931 44,72.931 44.15,72.781 44.15,71.725 44.3,71.575 44.6,71.575 44.75,71.725 44.75,72.781 44.9,72.931 45.2,72.931 45.35,72.781 45.35,71.725 45.5,71.575 45.8,71.575 45.95,71.725 45.95,72.781 46.1,72.931 46.4,72.931 46.55,72.781 46.55,71.725 46.7,71.575 47,71.575 47.15,71.725 47.15,72.781 47.3,72.931 47.6,72.931 47.75,72.781 47.75,71.725 47.9,71.575 48.2,71.575 48.35,71.725 48.35,72.781 48.5,72.931 48.8,72.931 48.95,72.781 48.95,71.725 49.1,71.575 49.4,71.575 49.55,71.725 49.55,72.781 49.7,72.931 50,72.931 50.15,72.781 50.15,71.725 50.3,71.575 50.6,71.575 50.75,71.725 50.75,72.781 50.9,72.931 51.2,72.931 51.35,72.781 51.35,71.725 51.5,71.575 51.8,71.575 51.95,71.725 51.95,72.781 52.1,72.931 52.4,72.931 52.55,72.781 52.55,71.725 52.7,71.575 53,71.575 53.15,71.725 53.15,72.781 53.3,72.931 53.6,72.931 53.75,72.781 53.75,71.725 53.9,71.575 54.2,71.575 54.35,71.725 54.35,72.781 54.5,72.931 54.8,72.931 54.95,72.781 54.95,71.725 55.1,71.575 55.4,71.575 55.55,71.725 55.55,72.227 55.7,72.377 56,72.377 56.15,72.227 56.15,71.725 56.3,71.575 56.6,71.575 56.75,71.725 56.75,72.156 56.9,72.306 57.2,72.306 57.35,72.156 57.35,71.725 57.5,71.575 57.95,71.575 58.054,71.679 58.446,71.679 58.55,71.575 59,71.575 59.15,71.725 59.15,72.156 59.3,72.306 59.6,72.306 59.75,72.156 59.75,71.725 59.9,71.575 60.346,71.575 61.061,70.86 73.273,70.86 73.683,70.45 v1(73.705,70.45)
  10_int9_(sign) w0.15: v1(19.602,67.975) 20.125,67.975 20.4,67.7 25.8,67.7 26.3,68.2 28.625,68.2 28.85,67.975 v1(29.25,67.975)
DDR4_SODIMM_DQ28: J8.66 J20.66 U1.AG12 | length 89.9
  1_Top w0.25: J20.66@18.4,63.475 v1(19.602,63.475) ; v1(29.25,63.475) J8.66@30.4,63.475 ; v1@73.694,69.439 U1.AG12@74.194,69.939 73.705,69.45 73.704,69.451 v1(73.704,69.453)
  5_int4_(sign) w0.15: v1(29.25,63.475) 29.6,63.475 29.8,63.275 29.8,61.15 29.95,61 30.35,61 30.475,61.125 30.475,63.5 30.6,63.625 30.975,63.625 31.1,63.5 31.1,60.775 31.4,60.475 32,60.475 32.1,60.575 32.1,61.025 32.225,61.15 32.525,61.15 32.925,60.75 33.225,60.75 33.425,60.95 33.425,61.2 33.65,61.425 34,61.425 34.125,61.3 34.125,60.725 34.3,60.55 34.6,60.55 34.775,60.725 34.775,61.65 34.95,61.825 35.3,61.825 35.45,61.675 35.45,60.8 35.562,60.687 35.987,60.687 36.125,60.825 36.125,61.7 36.225,61.8 36.575,61.8 36.775,61.6 36.775,61.35 36.95,61.175 38.83,61.175 43.59,56.415 43.59,55.625 44.59,54.625 55.95,54.625 61.564,60.239 61.564,61.364 62.15,61.95 62.25,61.95 62.575,62.275 63.15,62.275 63.475,61.95 63.9,61.95 63.9,61.975 64.1,62.175 64.425,62.175 64.65,61.95 64.85,61.95 64.85,61.975 65.064,62.189 65.414,62.189 65.539,62.064 65.561,62.064 65.675,61.95 65.925,61.95 66.16,62.185 66.415,62.185 66.65,61.95 66.85,61.95 67.075,62.175 67.325,62.175 67.55,61.95 67.725,61.95 67.975,61.7 68.15,61.7 68.4,61.95 69.15,61.95 69.45,61.65 70.125,61.65 70.425,61.95 70.819,61.95 71.11,62.241 71.11,62.479 71.516,62.885 71.693,62.885 71.766,62.959 72.041,62.959 72.25,62.75 72.25,62.1 72.525,61.825 72.925,61.825 73.15,62.05 73.15,63.7 73.425,63.975 73.95,63.975 74.309,64.334 74.309,64.575 74.075,64.809 74.075,65.075 74.3,65.3 74.309,65.3 74.309,65.5 74.3,65.5 74.075,65.725 74.075,66.091 74.309,66.325 74.309,66.55 74.05,66.809 74.05,67.1 74.25,67.3 74.309,67.3 74.309,67.475 74.675,67.841 74.675,68.309 74.309,68.675 74.309,68.824 73.704,69.43 v1(73.704,69.453)
  10_int9_(sign) w0.15: v1(19.602,63.475) 21.275,63.475 21.5,63.7 26.075,63.7 26.525,63.25 28.4,63.25 28.625,63.475 v1(29.25,63.475)
DDR4_SODIMM_DQ29: J8.67 J20.67 U1.AJ10 | length 85.9
  1_Top w0.25: J20.67@26.6,63.725 v1(27.75,63.725) ; v1(37.398,63.725) J8.67@38.6,63.725 ; U1.AJ10@72.194,67.939 72.261,67.939 72.7,67.5 v1(72.7,67.475)
  5_int4_(sign) w0.15: v1(37.398,63.725) 37.773,63.35 37.773,62.877 37.925,62.725 38.152,62.725 38.275,62.848 38.275,63.075 38.4,63.2 38.625,63.2 38.8,63.025 38.8,62.3 38.9,62.2 39.225,62.2 39.325,62.3 39.325,62.55 39.575,62.8 40.15,62.8 40.3,62.65 40.3,62.325 40.425,62.2 40.75,62.2 40.95,62 40.95,60.929 41.05,60.829 41.571,60.829 41.8,60.6 41.8,59.846 41.948,59.698 42.977,59.698 43.15,59.525 43.15,58.496 43.236,58.411 44.064,58.411 44.339,58.136 44.339,57.307 44.61,57.036 44.886,57.036 44.925,57.075 45.675,57.075 45.825,56.925 45.825,55.825 45.975,55.675 46.275,55.675 46.425,55.825 46.425,56.925 46.575,57.075 46.875,57.075 47.025,56.925 47.025,55.825 47.175,55.675 47.475,55.675 47.625,55.825 47.625,56.925 47.775,57.075 48.075,57.075 48.225,56.925 48.225,55.825 48.375,55.675 48.675,55.675 48.825,55.825 48.825,56.925 48.975,57.075 49.275,57.075 49.425,56.925 49.425,55.825 49.575,55.675 49.875,55.675 50.025,55.825 50.025,56.925 50.175,57.075 50.475,57.075 50.625,56.925 50.625,55.825 50.775,55.675 51.075,55.675 51.225,55.825 51.225,56.925 51.375,57.075 51.675,57.075 51.825,56.925 51.825,55.825 51.975,55.675 52.275,55.675 52.425,55.825 52.425,56.925 52.575,57.075 52.875,57.075 53.025,56.925 53.025,55.825 53.175,55.675 53.475,55.675 53.625,55.825 53.625,56.925 53.775,57.075 54.075,57.075 54.225,56.925 54.225,55.825 54.375,55.675 54.675,55.675 54.825,55.825 54.825,56.925 54.975,57.075 56.575,57.075 56.675,57.175 56.675,57.454 56.76,57.539 56.76,57.685 56.762,57.687 57.57,57.687 57.775,57.892 57.775,58.544 57.931,58.7 58.525,58.7 58.625,58.8 58.625,59.45 58.75,59.575 59.458,59.575 59.625,59.742 59.625,60.45 59.85,60.675 60.2,60.675 60.475,60.95 60.475,61.35 60.05,61.775 60.05,61.925 60.25,62.125 60.575,62.125 60.775,62.325 60.775,63.625 61.05,63.9 61.35,63.9 61.625,63.625 62,63.625 62.275,63.9 62.675,63.9 62.95,64.175 63.15,64.175 63.425,63.9 63.75,63.9 63.975,64.125 64.15,64.125 64.45,63.825 64.725,63.825 65.025,64.125 65.425,64.125 65.725,63.825 65.85,63.825 66.15,64.125 66.475,64.125 66.725,63.875 67.025,63.875 67.325,64.175 68.075,64.175 68.35,63.9 68.7,63.9 69.1,63.5 69.2,63.5 69.6,63.9 70.73,63.9 71.15,64.32 71.15,64.44 71.655,64.945 71.995,64.945 72.185,65.135 72.185,65.675 72.2,65.675 72.425,65.9 72.425,66.035 72.185,66.275 72.185,66.51 72.7,67.025 v1(72.7,67.475)
  12_int11_(sign) w0.15: v1(27.75,63.725) 28.4,63.075 29.6,63.075 29.95,63.425 32.15,63.425 32.45,63.725 v1(37.398,63.725)
DDR4_SODIMM_DQ30: J8.79 J20.79 U1.AJ8 | length 89.5
  1_Top w0.25: J20.79@26.6,66.725 v1(27.75,66.725) ; v1(37.398,66.725) J8.79@38.6,66.725 ; U1.AJ8@70.194,67.939 70.194,67.906 v1(70.65,67.45)
  5_int4_(sign) w0.15: v1(37.398,66.725) 37.975,66.725 38.975,65.725 40.1,65.725 40.25,65.575 41.325,65.575 42.265,64.635 42.265,63.935 42.512,63.688 43.025,63.688 43.2,63.863 43.5,63.863 43.65,63.713 43.65,62.148 43.8,61.998 44.1,61.998 44.25,62.148 44.25,63.688 44.4,63.838 44.7,63.838 44.85,63.688 44.85,62.148 45,61.998 45.3,61.998 45.45,62.148 45.45,63.688 45.6,63.838 45.9,63.838 46.05,63.688 46.05,62.148 46.2,61.998 46.5,61.998 46.65,62.148 46.65,63.688 46.8,63.838 47.1,63.838 47.25,63.688 47.25,62.148 47.4,61.998 47.7,61.998 47.85,62.148 47.85,63.688 48,63.838 48.3,63.838 48.45,63.688 48.45,62.148 48.6,61.998 48.9,61.998 49.05,62.148 49.05,63.688 49.2,63.838 49.5,63.838 49.65,63.688 49.65,62.148 49.8,61.998 50.1,61.998 50.25,62.148 50.25,63.688 50.4,63.838 50.7,63.838 50.85,63.688 50.85,62.148 51,61.998 51.3,61.998 51.45,62.148 51.45,63.688 51.6,63.838 51.9,63.838 52.05,63.688 52.05,62.148 52.2,61.998 52.5,61.998 52.65,62.148 52.65,63.688 52.8,63.838 53.1,63.838 53.25,63.688 53.25,62.148 53.4,61.998 53.7,61.998 53.85,62.148 53.85,63.688 54,63.838 54.3,63.838 54.45,63.688 54.45,62.148 54.6,61.998 54.9,61.998 55.05,62.148 55.05,63.538 55.2,63.688 55.5,63.688 55.65,63.538 55.65,62.148 55.8,61.998 56.1,61.998 56.25,62.148 56.25,63.688 56.4,63.838 56.7,63.838 56.85,63.688 56.85,62.148 57,61.998 57.3,61.998 57.45,62.148 57.45,63.538 57.6,63.688 58.613,63.688 59.1,64.175 59.1,64.675 61.35,66.925 70.125,66.925 v1(70.65,67.45)
  12_int11_(sign) w0.15: v1(27.75,66.725) 28.375,67.35 29.405,67.35 29.78,66.975 31.825,66.975 32.075,66.725 v1(37.398,66.725)
DDR4_SODIMM_DQ31: J8.80 J20.80 U1.AG11 | length 90.2
  1_Top w0.25: J20.80@18.4,66.975 v1(19.602,66.975) ; v1(29.25,66.975) J8.80@30.4,66.975 ; v1@72.704,69.428 72.704,69.449 U1.AG11@73.194,69.939 72.73,69.475 72.726,69.478 v1(72.704,69.478)
  5_int4_(sign) w0.15: v1(29.25,66.975) 32.8,66.975 36.89,71.065 37.328,71.065 37.478,71.215 37.478,71.242 37.628,71.392 37.928,71.392 38.078,71.242 38.078,69.77 38.228,69.62 38.528,69.62 38.678,69.77 38.678,71.065 38.753,71.14 39.203,71.14 39.278,71.065 39.278,70.766 39.428,70.616 39.728,70.616 39.878,70.766 39.878,70.915 40.028,71.065 40.328,71.065 40.478,70.915 40.478,69.77 40.628,69.62 40.928,69.62 41.078,69.77 41.078,70.915 41.228,71.065 41.528,71.065 41.678,70.915 41.678,70.107 41.828,69.957 42.128,69.957 42.278,70.107 42.278,70.915 42.428,71.065 42.728,71.065 42.878,70.915 42.878,70.107 43.028,69.957 43.328,69.957 43.478,70.107 43.478,70.915 43.628,71.065 43.928,71.065 44.078,70.915 44.078,70.107 44.228,69.957 44.528,69.957 44.678,70.107 44.678,70.915 44.828,71.065 45.128,71.065 45.278,70.915 45.278,70.107 45.428,69.957 45.728,69.957 45.878,70.107 45.878,70.915 46.028,71.065 46.328,71.065 46.478,70.915 46.478,70.107 46.628,69.957 46.928,69.957 47.078,70.107 47.078,70.915 47.228,71.065 47.528,71.065 47.678,70.915 47.678,70.107 47.828,69.957 48.128,69.957 48.278,70.107 48.278,70.915 48.428,71.065 48.728,71.065 48.878,70.915 48.878,70.107 49.028,69.957 49.328,69.957 49.478,70.107 49.478,70.915 49.628,71.065 49.928,71.065 50.078,70.915 50.078,70.107 50.228,69.957 50.528,69.957 50.678,70.107 50.678,70.915 50.828,71.065 51.128,71.065 51.278,70.915 51.278,70.107 51.428,69.957 51.728,69.957 51.878,70.107 51.878,70.915 52.028,71.065 52.328,71.065 52.478,70.915 52.478,70.107 52.628,69.957 52.928,69.957 53.078,70.107 53.078,70.915 53.228,71.065 53.528,71.065 53.678,70.915 53.678,70.107 53.828,69.957 54.128,69.957 54.278,70.107 54.278,70.915 54.428,71.065 54.728,71.065 54.878,70.915 54.878,70.107 55.028,69.957 55.328,69.957 55.478,70.107 55.478,70.915 55.628,71.065 55.928,71.065 56.078,70.915 56.078,70.107 56.228,69.957 56.528,69.957 56.678,70.107 56.678,70.915 56.828,71.065 60.025,71.065 61.19,69.9 72.233,69.9 72.655,69.478 v1(72.704,69.478)
  10_int9_(sign) w0.15: v1(19.602,66.975) 21.375,66.975 21.65,66.7 26,66.7 26.525,67.225 28.6,67.225 28.85,66.975 v1(29.25,66.975)
DDR4_SODIMM_DQ32: J8.174 J20.174 U1.AE3 | length 86.8
  1_Top w0.25: J20.174@18.4,92.475 v1(19.602,92.475) ; v1(29.25,92.475) J8.174@30.4,92.475 ; v1(64.7,71.475) 64.788,71.475 65.194,71.881 U1.AE3@65.194,71.939
  7_int6_(sign) w0.15: v1(29.25,92.475) 29.275,92.45 33.55,92.45 33.756,92.244 33.968,92.244 34.54,92.816 34.752,92.816 34.964,92.604 34.964,92.391 34.146,91.574 34.146,91.361 34.358,91.149 34.571,91.149 35.388,91.967 35.601,91.967 35.813,91.755 35.813,91.543 35.135,90.865 34.995,90.725 34.995,90.513 35.207,90.301 35.419,90.301 35.493,90.375 35.625,90.375 36.275,89.725 37.5,89.725 38.9,88.325 38.9,70.2 39.325,69.775 48.825,69.775 48.925,69.675 48.925,68.7 49.046,68.579 49.925,68.579 50.075,68.429 50.075,68.385 50.225,68.235 50.525,68.235 50.675,68.385 50.675,69.629 50.825,69.779 51.125,69.779 51.275,69.629 51.275,68.385 51.425,68.235 51.725,68.235 51.875,68.385 51.875,69.629 52.025,69.779 52.325,69.779 52.475,69.629 52.475,68.385 52.625,68.235 52.925,68.235 53.075,68.385 53.075,68.504 53.15,68.579 54.229,68.579 56.439,66.368 59.893,66.368 60.475,66.95 65.05,66.95 65.225,67.125 65.225,70.95 v1(64.7,71.475)
  10_int9_(sign) w0.15: v1(19.602,92.475) 20.55,92.475 20.775,92.25 25.85,92.25 26.35,92.75 28.35,92.75 28.625,92.475 v1(29.25,92.475)
DDR4_SODIMM_DQ33: J8.173 J20.173 U1.AF2 | length 84.6
  1_Top w0.25: J20.173@26.6,92.225 v1(27.75,92.225) ; v1(37.398,92.225) J8.173@38.6,92.225 ; v1(63.675,70.375) 63.675,70.42 U1.AF2@64.194,70.939
  7_int6_(sign) w0.15: v1(37.398,92.225) 39.398,90.225 40,90.225 41.15,89.075 41.15,72.725 41.5,72.375 42.525,72.375 42.651,72.249 42.999,72.249 43.125,72.375 43.125,73.958 43.275,74.108 43.575,74.108 43.725,73.958 43.725,72.375 43.851,72.249 44.199,72.249 44.325,72.375 44.325,73.958 44.475,74.108 44.775,74.108 44.925,73.958 44.925,72.375 45.051,72.249 45.399,72.249 45.525,72.375 45.525,73.958 45.675,74.108 45.975,74.108 46.125,73.958 46.125,72.375 46.251,72.249 46.599,72.249 46.725,72.375 46.725,73.958 46.875,74.108 47.175,74.108 47.325,73.958 47.325,72.375 47.451,72.249 47.799,72.249 47.925,72.375 47.925,73.958 48.075,74.108 48.375,74.108 48.525,73.958 48.525,72.375 48.651,72.249 48.999,72.249 49.125,72.375 49.125,73.958 49.275,74.108 49.575,74.108 49.725,73.958 49.725,72.375 49.851,72.249 50.199,72.249 50.325,72.375 50.325,73.958 50.475,74.108 50.775,74.108 50.925,73.958 50.925,72.525 51.075,72.375 51.975,72.375 55.772,68.578 61.378,68.578 61.66,68.86 63.71,68.86 64.175,69.325 64.175,69.875 v1(63.675,70.375)
  12_int11_(sign) w0.15: v1(27.75,92.225) 27.975,92 30.55,92 31.075,92.525 31.9,92.525 32.2,92.225 v1(37.398,92.225)
DDR4_SODIMM_DQ34: J8.187 J20.187 U1.AE1 | length 84.5
  1_Top w0.25: J20.187@26.6,95.725 v1(27.75,95.725) ; v1(37.398,95.725) J8.187@38.6,95.725 ; v1(62.625,71.425) 63.139,71.939 U1.AE1@63.194,71.939
  7_int6_(sign) w0.15: v1(37.398,95.725) 38.323,94.8 40.734,94.8 41.016,94.517 41.281,94.517 41.311,94.547 41.576,94.547 41.841,94.281 41.841,94.016 40.822,92.997 40.822,92.732 41.087,92.467 41.352,92.467 42.371,93.486 42.637,93.486 42.902,93.221 42.902,92.956 41.883,91.936 41.883,91.671 42.148,91.406 42.413,91.406 43.432,92.425 43.697,92.425 43.962,92.16 43.962,91.895 42.983,90.915 42.983,90.65 43.248,90.385 43.513,90.385 44.198,91.07 44.463,91.07 46.61,88.924 46.61,88.488 46.797,88.3 47.822,88.3 48.01,88.113 48.01,87.738 47.822,87.55 46.797,87.55 46.61,87.363 46.61,86.988 46.797,86.8 47.822,86.8 48.01,86.613 48.01,86.238 47.822,86.05 46.797,86.05 46.61,85.863 46.61,85.488 46.797,85.3 47.822,85.3 48.01,85.113 48.01,84.738 47.822,84.55 46.797,84.55 46.61,84.363 46.61,83.988 46.797,83.8 47.822,83.8 48.01,83.613 48.01,83.238 47.822,83.05 46.797,83.05 46.61,82.863 46.61,82.488 46.797,82.3 47.822,82.3 48.01,82.113 48.01,81.738 47.822,81.55 46.797,81.55 46.61,81.363 46.61,80.988 46.797,80.8 47.822,80.8 48.01,80.613 48.01,80.238 47.822,80.05 46.797,80.05 46.61,79.863 46.61,79.488 46.797,79.3 47.822,79.3 48.01,79.113 48.01,78.738 47.822,78.55 46.797,78.55 46.61,78.363 46.61,77.988 46.797,77.8 47.822,77.8 48.01,77.613 48.01,77.238 47.822,77.05 46.797,77.05 46.61,76.863 46.61,76.265 46.775,76.1 52.025,76.1 56.446,71.679 58.254,71.679 58.7,72.125 58.925,72.125 59.362,71.688 59.84,71.688 60.104,71.425 v1(62.625,71.425)
  12_int11_(sign) w0.15: v1(27.75,95.725) 28.075,95.725 28.7,95.1 29.625,95.1 30,95.475 32,95.475 32.25,95.725 v1(37.398,95.725)
DDR4_SODIMM_DQ35: J8.186 J20.186 U1.AC1 | length 84.6
  1_Top w0.25: J20.186@18.4,95.475 v1(19.602,95.475) ; v1(29.25,95.475) J8.186@30.4,95.475 ; U1.AC1@63.194,73.939 63.194,73.906 v1(63.675,73.425)
  7_int6_(sign) w0.15: v1(29.25,95.475) 29.5,95.475 30.2,96.175 30.2,98.275 30.5,98.575 36.575,98.575 36.9,98.25 38.1,98.25 38.46,98.61 40.311,98.61 40.654,98.267 40.919,98.267 41.361,98.709 41.626,98.709 41.891,98.444 41.891,98.179 41.274,97.562 41.274,97.297 41.539,97.032 41.805,97.032 42.422,97.649 42.687,97.649 42.952,97.384 42.952,97.118 42.335,96.501 42.335,96.236 42.6,95.971 42.865,95.971 43.482,96.588 43.747,96.588 44.013,96.323 44.013,96.058 43.396,95.441 43.396,95.176 43.661,94.91 43.926,94.91 44.543,95.527 44.808,95.527 45.073,95.262 45.073,94.997 44.456,94.38 44.456,94.115 44.721,93.85 44.987,93.85 45.029,93.892 45.604,94.467 45.869,94.467 46.134,94.202 46.134,93.936 45.559,93.362 45.517,93.319 45.517,93.054 45.782,92.789 46.047,92.789 46.09,92.832 46.664,93.406 46.929,93.406 47.195,93.141 47.195,92.876 46.62,92.301 46.578,92.259 46.578,91.994 46.843,91.728 47.108,91.728 47.15,91.771 47.725,92.345 47.99,92.345 48.255,92.08 48.255,91.815 47.681,91.241 47.638,91.198 47.638,90.933 47.903,90.668 48.169,90.668 48.211,90.71 48.786,91.285 49.051,91.285 49.316,91.02 49.316,90.754 48.741,90.18 48.699,90.137 48.699,89.872 48.964,89.607 49.229,89.607 49.272,89.65 49.846,90.224 50.111,90.224 50.377,89.959 50.377,89.694 49.802,89.119 49.738,89.055 49.738,88.79 50.003,88.524 50.397,88.524 52.09,86.831 52.09,78.785 55.35,75.525 57.976,75.525 58.95,74.551 58.95,74.199 59.199,73.95 59.742,73.95 60.652,73.04 63.34,73.04 63.675,73.375 v1(63.675,73.425)
  10_int9_(sign) w0.15: v1(19.602,95.475) 20.875,95.475 21.125,95.725 26.07,95.725 26.545,96.2 28.275,96.2 29,95.475 v1(29.25,95.475)
DDR4_SODIMM_DQ36: J8.170 J20.170 U1.AF3 | length 86.6
  1_Top w0.25: J20.170@18.4,91.475 v1(19.602,91.475) ; v1(29.25,91.475) J8.170@30.4,91.475 ; U1.AF3@65.194,70.939 65.194,70.906 v1(65.725,70.375)
  7_int6_(sign) w0.15: v1(29.25,91.475) 32.75,91.475 35.05,89.175 36.95,89.175 38.2,87.925 38.2,69.775 39.275,68.7 40.05,68.7 41.025,67.725 42,67.725 42.105,67.62 42.495,67.62 42.6,67.725 42.6,68.698 42.75,68.848 43.05,68.848 43.2,68.698 43.2,67.725 43.305,67.62 43.695,67.62 43.8,67.725 43.8,68.698 43.95,68.848 44.25,68.848 44.4,68.698 44.4,67.725 44.505,67.62 44.895,67.62 45,67.725 45,68.698 45.15,68.848 45.45,68.848 45.6,68.698 45.6,67.725 45.705,67.62 46.095,67.62 46.2,67.725 46.2,68.698 46.35,68.848 46.65,68.848 46.8,68.698 46.8,67.725 46.905,67.62 47.295,67.62 47.4,67.725 47.4,68.698 47.55,68.848 47.85,68.848 48,68.698 48,67.875 48.15,67.725 53.874,67.725 55.741,65.858 60.105,65.858 60.431,66.185 62.319,66.185 62.504,66 65.85,66 66.175,66.325 66.175,69.85 65.725,70.3 v1(65.725,70.375)
  10_int9_(sign) w0.15: v1(19.602,91.475) 20.35,91.475 20.575,91.25 25.8,91.25 26.275,91.725 28.475,91.725 28.725,91.475 v1(29.25,91.475)
DDR4_SODIMM_DQ37: J8.169 J20.169 U1.AG2 | length 84.5
  1_Top w0.25: J20.169@26.6,91.225 v1(27.75,91.225) ; v1(37.398,91.225) J8.169@38.6,91.225 ; U1.AG2@64.194,69.939 64.65,69.483 v1(64.65,69.454)
  7_int6_(sign) w0.15: v1(37.398,91.225) 39.348,89.275 39.975,89.275 40.475,88.775 40.475,70.775 40.711,70.539 41.571,70.539 41.825,70.285 42.125,70.285 42.275,70.435 42.275,71.589 42.425,71.739 42.725,71.739 42.875,71.589 42.875,70.435 43.025,70.285 43.325,70.285 43.475,70.435 43.475,71.589 43.625,71.739 43.925,71.739 44.075,71.589 44.075,70.435 44.225,70.285 44.525,70.285 44.675,70.435 44.675,71.589 44.825,71.739 45.125,71.739 45.275,71.589 45.275,70.435 45.425,70.285 45.725,70.285 45.875,70.435 45.875,71.589 46.025,71.739 46.325,71.739 46.475,71.589 46.475,70.435 46.625,70.285 46.925,70.285 47.075,70.435 47.075,71.589 47.225,71.739 47.525,71.739 47.675,71.589 47.675,70.435 47.825,70.285 48.125,70.285 48.275,70.435 48.275,71.589 48.425,71.739 48.725,71.739 48.875,71.589 48.875,70.394 49.025,70.244 49.325,70.244 49.475,70.394 49.475,71.589 49.625,71.739 49.925,71.739 50.075,71.589 50.075,70.341 50.225,70.191 50.525,70.191 50.675,70.341 50.675,71.589 50.825,71.739 51.125,71.739 51.275,71.589 51.275,70.341 51.425,70.191 51.725,70.191 51.875,70.341 51.875,71.054 52.025,71.204 52.325,71.204 52.475,71.054 52.475,70.689 52.625,70.539 52.989,70.539 55.8,67.728 56.4,67.728 56.625,67.503 56.625,67.5 56.85,67.275 57.075,67.275 57.528,67.728 60.429,67.728 60.701,68 63.925,68 64.225,68.3 64.225,68.615 64.65,69.04 v1(64.65,69.454)
  12_int11_(sign) w0.15: v1(27.75,91.225) 27.925,91.05 29.425,91.05 29.875,90.6 32.175,90.6 32.8,91.225 v1(37.398,91.225)
DDR4_SODIMM_DQ38: J8.183 J20.183 U1.AE2 | length 84.8
  1_Top w0.25: J20.183@26.6,94.725 v1(27.75,94.725) ; v1(37.398,94.725) J8.183@38.6,94.725 ; v1(63.75,71.425) 64.194,71.869 U1.AE2@64.194,71.939
  7_int6_(sign) w0.15: v1(37.398,94.725) 37.898,94.225 38.375,94.225 39.225,93.375 39.9,93.375 40.3,92.975 40.3,92.325 42.75,89.875 44.25,89.875 44.7,89.425 44.7,89.088 44.887,88.9 45.912,88.9 46.1,88.713 46.1,88.338 45.912,88.15 44.511,88.15 44.324,87.963 44.324,87.588 44.511,87.4 45.912,87.4 46.1,87.213 46.1,86.838 45.912,86.65 44.7,86.65 44.515,86.465 44.515,86.085 44.7,85.9 45.912,85.9 46.1,85.713 46.1,85.338 45.912,85.15 44.7,85.15 44.515,84.965 44.515,84.585 44.7,84.4 45.912,84.4 46.1,84.213 46.1,83.838 45.912,83.65 44.652,83.65 44.465,83.463 44.465,83.088 44.652,82.9 45.912,82.9 46.1,82.713 46.1,82.338 45.912,82.15 44.496,82.15 44.309,81.963 44.309,81.588 44.496,81.4 45.912,81.4 46.1,81.213 46.1,80.838 45.912,80.65 44.677,80.65 44.49,80.463 44.49,80.088 44.677,79.9 45.912,79.9 46.1,79.713 46.1,79.338 45.912,79.15 44.7,79.15 44.565,79.015 44.565,78.535 44.7,78.4 45.912,78.4 46.1,78.213 46.1,77.838 45.912,77.65 44.7,77.65 44.565,77.515 44.565,77.035 44.7,76.9 44.7,76.025 45.225,75.5 51.675,75.5 56.006,71.169 56.65,71.169 56.775,71.044 56.775,70.625 56.975,70.425 57.25,70.425 57.475,70.65 57.475,70.869 57.775,71.169 58.2,71.169 58.375,70.994 58.375,70.825 58.65,70.55 58.875,70.55 59,70.675 59,70.902 59.277,71.178 59.629,71.178 59.9,70.907 59.9,70.175 60.175,69.9 60.375,69.9 60.675,70.2 61,70.2 61.15,70.35 61.15,70.825 61.24,70.915 64.065,70.915 64.175,71.025 64.175,71.325 64.075,71.425 v1(63.75,71.425)
  12_int11_(sign) w0.15: v1(27.75,94.725) 28.2,94.725 28.85,94.075 29.525,94.075 29.975,94.525 31.925,94.525 32.125,94.725 v1(37.398,94.725)